# Altium PCB Main Board-v1.0.PcbDoc
Units mm, origin at the board's own origin, x right, y up, seen from the top; angles counter-clockwise.
Board outline 30 x 18 mm, 2 copper layers (Top Layer, Bottom Layer), stack 1.57 mm thick; 50 components, 32 nets, 177 pads, 55 vias.
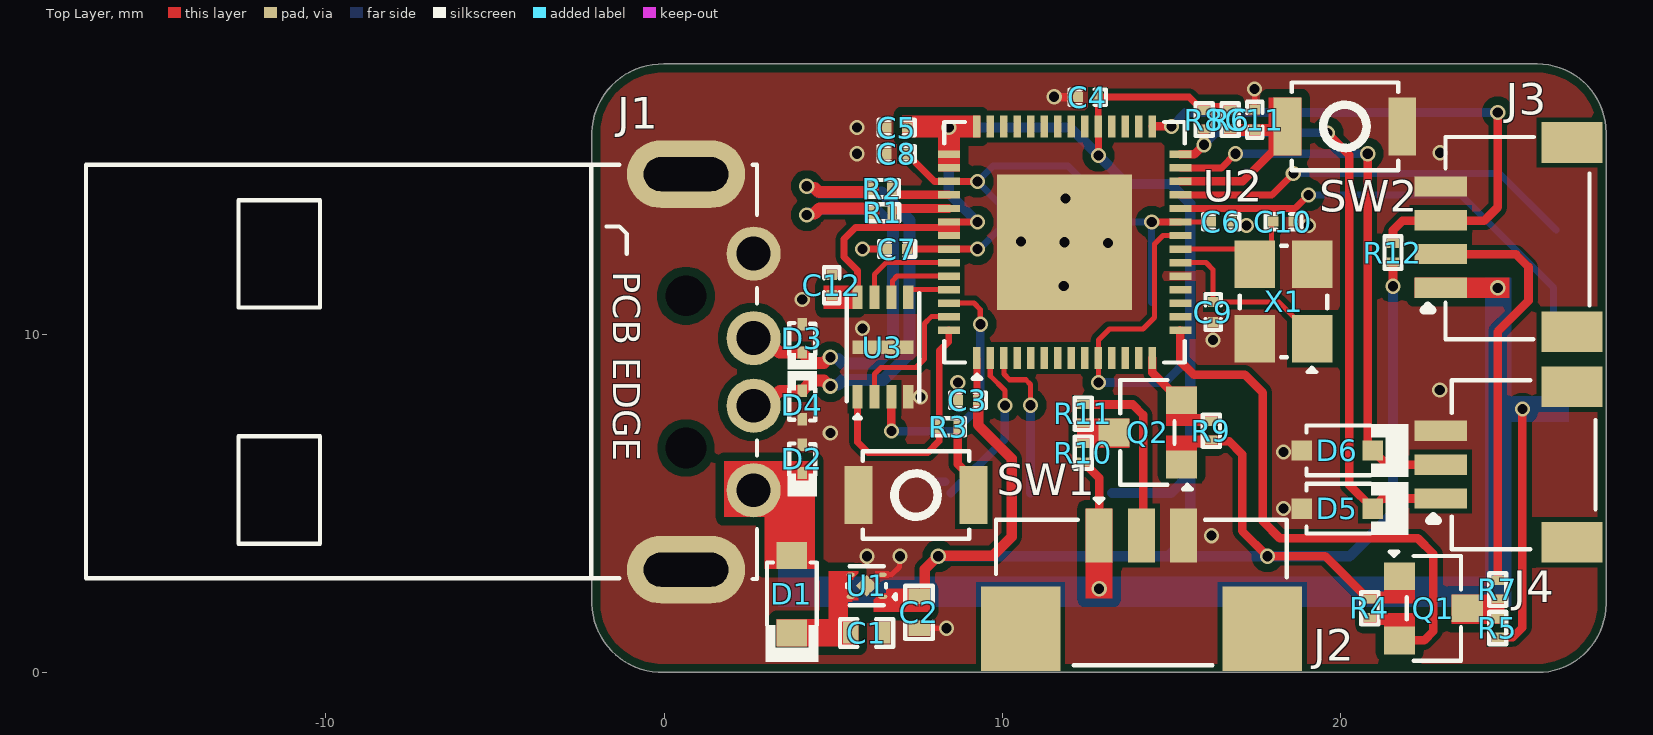
[diagram p0: Top Layer view]
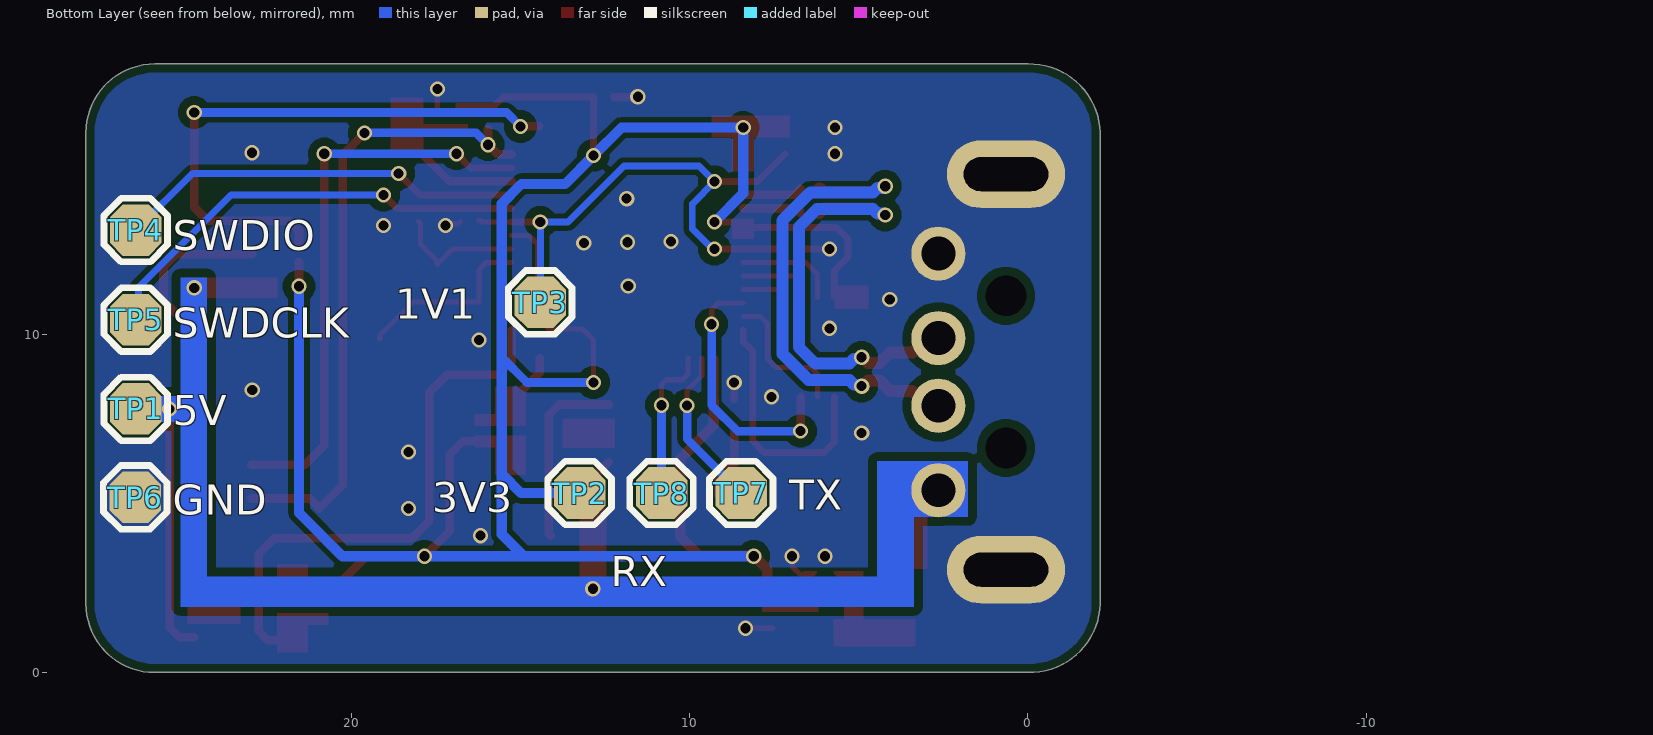
[diagram p1: Bottom Layer view, seen from below]

## Layer stack, top to bottom
Top Solder: solder mask 0.01, Solder Resist, Dk 3.5
Top Layer: signal copper 0.035
Dielectric 1: dielectric 1.5, FR-4, Dk 4.8
Bottom Layer: signal copper 0.035
Bottom Solder: solder mask 0.01, Solder Resist, Dk 3.5

## Board outline
-2.134,2.032 -2.134,15.968 cw(c-0.051,15.917) 0,18 25.834,18 cw(c25.834,15.968) 27.866,15.968 27.866,2.032 cw(c25.834,2.032) 25.834,0 0,0 cw(c-0.051,2.083)

## Design rules (kind name [scope] priority, off if disabled: settings)
BoardOutlineClearance [All] p1: gap=0 ignorepadtopadclearanceinfootprint=FALSE except(0.254: Poly-OutlineEdge)
Clearance "Differential clearance" [InDifferentialPairClass('USB A')] p1: gap=0.254 ignorepadtopadclearanceinfootprint=TRUE except(0: Arc-Hole Track-Hole SMDPad-Hole THPad-Hole Via-Hole Fill-Hole Poly-Hole Region-Hole Text-Hole; 0.127: Arc-Arc Arc-Track Arc-SMDPad Track-Track Track-SMDPad; 0.152: Arc-Fill Arc-Poly Arc-Region Track-Fill Track-Poly Track-Region SMDPad-SMDPad SMDPad-Fill SMDPad-Poly SMDPad-Region)
Clearance [All] p2: gap=0.254 ignorepadtopadclearanceinfootprint=TRUE except(0: Arc-Hole Track-Hole SMDPad-Hole THPad-Hole Via-Hole Fill-Hole Poly-Hole Region-Hole Text-Hole; 0.127: Arc-Arc Arc-Track Arc-SMDPad Track-Track Track-SMDPad; 0.152: Arc-Fill Arc-Poly Arc-Region Track-Fill Track-Poly Track-Region SMDPad-SMDPad SMDPad-Fill SMDPad-Poly SMDPad-Region; 0.178: Arc-Via Track-Via SMDPad-Via)
ComponentClearance [All] p1: gap=0 collisioncheckmode=3 verticalgap=0.254 showdistances=FALSE
DiffPairsRouting [InDifferentialPairClass('USB A')] p1: maxlimit=0.127 minlimit=0.127 mostfreqgap=0.127 toplayer_minwidth=0.356 toplayer_maxwidth=0.356 toplayer_prefwidth=0.356 bottomlayer_minwidth=0.356 bottomlayer_maxwidth=0.356 bottomlayer_prefwidth=0.356 impedanceprofiledriven=TRUE impedanceprofileid={A3CE3727-35C4-4ABA-9746-1EB76A5391A9} impedanceprofilevalue=90.000000 maxuncoupledlength=12.7
Height [All] p1: minheight=0 maxheight=35 prefheight=0
MinimumSolderMaskSliver [All] p1: minsoldermaskwidth=0
PolygonConnect [All] p1: connectstyle=Direct reliefconductorwidth=0.254 reliefentries=4 polygonreliefangle="90 Angle" airgapwidth=0.254
RoutingVias [All] p1: holewidth=0.3 width=0.45 viastyle="Through Hole" minholewidth=0.3 minwidth=0.45 maxholewidth=0.3 maxwidth=0.45
SilkToSilkClearance [All] p1: silktosilkclearance=0
SilkToSolderMaskClearance [IsPad] p1: minsilkscreentomaskgap=0 clearancetoexposedcopper=TRUE
SolderMaskExpansion [All] p1: expansion=0.102 istentingtop=FALSE
Width [All] p1: maxlimit=0.305 minlimit=0.152 preferedwidth=0.254
24 further rules are at their usual default settings.

## Classes and differential pairs
differential pair class "USB A": USB_D USB_D+
differential pair USB_D+: +USB_D+_P -USB_D+_N

## Components (designator, comment, footprint, x,y, rotation, side; value= is the part's Value field where it differs from the comment)
C1 "10uF" Cap-0402 5.994,1.168 r180 top
C2 "10uF" Cap-0402 7.544,1.778 r90 top
C3 "0.1uF" CAP-0201 8.992,8.052 r180 top
C4 "0.1uF" CAP-0201 12.54,17.018 r180 top
C5 "0.1uF" CAP-0201 6.883,16.119 r180 top
C6 "0.1uF" CAP-0201 16.485,13.335 r0 top
C7 "0.1uF" CAP-0201 6.896,12.525 r180 top
C8 "1uF" Cap-0201 6.883,15.342 r180 top
C9 "15pF" Cap-0201 16.244,10.662 r90 top
C10 "15pF" Cap-0201 18.324,13.335 r180 top
C11 "0.1uF" CAP-0201 17.476,16.353 r270 top
C12 "0.1uF" CAP-0201 4.962,11.457 r270 top
D1 "NSR0320MW2T1G" SOD-323 3.785,2.311 r90 top value=25pF
D2 "DF2S6.8FS,L3M" SOD-923. 4.089,6.318 r90 top
D3 "DF2S6.8FS,L3M" SOD-923. 4.089,9.881 r90 top locked
D4 "DF2S6.8FS,L3M" SOD-923. 4.089,7.911 r270 top locked
D5 "MM3Z3V3B" SOD323F 19.919,4.847 r0 top
D6 "MM3Z3V3B" SOD323F 19.919,6.568 r0 top
J1 "USB-05." USB-05. 1.651,8.89 r270 top locked
J2 "HC-1.25-3PLT" HC-1.25-3PLT 14.122,2.667 r0 top
J3 "SM04B-SRSS-TB(LF)(SN)" SM04B-SRSS-TB(LF)(SN) 24.917,12.878 r90 top locked
J4 "SM03B-SRSS-TB(LF)(SN)" SM03B-SRSS-TB(LF)(SN) 24.917,6.147 r90 top locked
Q1 "Si2302CDS" Sot-23 22.761,1.898 r270 top
Q2 "Si2302CDS" Sot-23 14.313,7.099 r90 top
R1 "27R" Res-0201 6.475,13.598 r180 top
R2 "27R" Res-0201 6.462,14.316 r180 top
R3 "1K" Res-0201 8.417,7.264 r180 top value=1kR
R4 "10K" Res-0201 20.882,1.898 r90 top
R5 "10K" Res-0201 24.663,1.315 r270 top
R6 "10K" Res-0201 16.746,16.353 r90 top
R7 "75R" Res-0201 24.663,2.448 r90 top
R8 "10K" Res-0201 15.977,16.353 r270 top
R9 "10K" Res-0201 16.192,7.15 r270 top
R10 "10K" Res-0201 12.403,6.499 r270 top
R11 "75R" Res-0201 12.403,7.652 r90 top
R12 "10K" Res-0201 21.565,12.421 r90 top
SW1 "B3U-1000P" B3U-1000P 7.456,5.248 r180 top locked
SW2 "B3U-1000P" B3U-1000P 20.142,16.154 r0 top locked
TP1 "TEST POINT" Test-point 26.394,7.796 r0 bottom
TP2 "TEST POINT" Test-point 13.259,5.309 r0 bottom
TP3 "TEST POINT" Test-point 14.426,10.947 r0 bottom
TP4 "TEST POINT" Test-point 26.394,13.086 r0 bottom
TP5 "TEST POINT" Test-point 26.394,10.437 r0 bottom
TP6 "TEST POINT" Test-point 26.407,5.18 r0 bottom
TP7 "TEST POINT" Test-point 8.484,5.309 r0 bottom
TP8 "TEST POINT" Test-point 10.84,5.309 r0 bottom
U1 "RS3236-3.3YUTDN4" XDFN-4-EP(1x1) 5.994,2.565 r180 top
U2 "RP2040" "56-QFN (7X7)" 11.849,12.725 r90 top locked
U3 "GD25Q16EEIGR" USON-8(2x3) 6.477,9.627 r90 top
X1 "12MHz" SMD3225-4P 18.326,10.973 r90 top

## Footprints (in the part's own frame and the unit in brackets; to place one, negate y for a bottom-side part, rotate by r counter-clockwise, add the part's x,y. Pads: shape width x height; smd on the part's side, far side on the other; paste and mask are expansions set on the pad)
"56-QFN (7X7)" [mm]
  rect 0.65x0.22 smd mask+0.055: 1(-3.425,2.6) 2(-3.425,2.2) 3(-3.425,1.8) 4(-3.425,1.4) 5(-3.425,1) 6(-3.425,0.6) 7(-3.425,0.2) 8(-3.425,-0.2) 9(-3.425,-0.6) 10(-3.425,-1) 11(-3.425,-1.4) 12(-3.425,-1.8) 13(-3.425,-2.2) 14(-3.425,-2.6) 29(3.425,-2.6) 30(3.425,-2.2) 31(3.425,-1.8) 32(3.425,-1.4) 33(3.425,-1) 34(3.425,-0.6) 35(3.425,-0.2) 36(3.425,0.2) 37(3.425,0.6) 38(3.425,1) 39(3.425,1.4) 40(3.425,1.8) 41(3.425,2.2) 42(3.425,2.6)
  rect 0.22x0.65 smd mask+0.055: 15(-2.6,-3.425) 16(-2.2,-3.425) 17(-1.8,-3.425) 18(-1.4,-3.425) 19(-1,-3.425) 20(-0.6,-3.425) 21(-0.2,-3.425) 22(0.2,-3.425) 23(0.6,-3.425) 24(1,-3.425) 25(1.4,-3.425) 26(1.8,-3.425) 27(2.2,-3.425) 28(2.6,-3.425) 43(2.6,3.425) 44(2.2,3.425) 45(1.8,3.425) 46(1.4,3.425) 47(1,3.425) 48(0.6,3.425) 49(0.2,3.425) 50(-0.2,3.425) 51(-0.6,3.425) 52(-1,3.425) 53(-1.4,3.425) 54(-1.8,3.425) 55(-2.2,3.425) 56(-2.6,3.425)
  rect 4x4 smd mask+0.055: 57(0,0)
  silkscreen extent -4.04,-3.56 3.56,3.56, body extent -3.5,-3.51 3.5,3.49, height 0.92
B3U-1000P [mm] "SWITCH TACTILE SPST-NO 0.05A 12V"
  rect 0.82x1.72 smd: 1(-1.7,0) 2(1.7,0)
  silkscreen extent -1.57,-1.3 1.57,1.3, body extent -2,-1.26 2,1.24, height 1.6
CAP-0201 [mm]
  rect 0.3x0.3 smd mask+0.055: 1(-0.3,0) 2(0.3,0)
  silkscreen extent -0.53,-0.23 0.53,0.23, body extent -0.3,-0.15 0.3,0.15, height 0.28
Cap-0201 [mm]
  rect 0.3x0.3 smd mask+0.055: 1(-0.3,0) 2(0.3,0)
  silkscreen extent -0.53,-0.23 0.53,0.23, body extent -0.3,-0.15 0.3,0.15, height 0.28
Cap-0402 [mil]
  rect 18x25 smd mask+2.36: 1(-18.5,0) 2(18.5,0)
  silkscreen extent -31,-16 31,16, body extent -20,-10 20,10, height 19
HC-1.25-3PLT [mm]
  rect 0.8x1.6 smd paste+0 mask+0.05: 1(-1.25,1.38) 2(0,1.38) 3(1.25,1.38)
  rect 2.35x2.5 smd paste+0 mask+0.05: MP1(-3.575,-1.38) MP2(3.575,-1.38)
  silkscreen extent -4.3,-2.45 4.3,2.48, body extent -4.3,-2.18 4.3,1.74, height 4.71
Res-0201 [mm]
  rect 0.27x0.37 smd mask+0.055: 1(-0.275,0) 2(0.275,0)
  silkscreen extent -0.48,-0.25 0.48,0.25, body extent -0.3,-0.15 0.3,0.15, height 0.29
SM03B-SRSS-TB(LF)(SN) [mm]
  rect 0.6x1.55 smd paste+0 mask+0.051: 1(-1,1.938) 2(0,1.938) 3(1,1.938)
  rect 1.2x1.8 smd paste+0 mask+0.051: MP1(-2.3,-1.938) MP2(2.3,-1.938)
  silkscreen extent -2.5,-2.64 2.5,2.29, body extent -2.5,-2.58 2.5,2.37, height 2.91
SM04B-SRSS-TB(LF)(SN) [mm]
  rect 0.6x1.55 smd paste+0 mask+0.051: 1(-1.5,1.938) 2(-0.5,1.938) 3(0.5,1.938) 4(1.5,1.938)
  rect 1.2x1.8 smd paste+0 mask+0.051: MP1(-2.8,-1.938) MP2(2.8,-1.938)
  silkscreen extent -3.02,-2.46 2.96,2.45, body extent -3,-2.52 3,2.43, height 2.96
SMD3225-4P [mm]
  rect 1.4x1.2 smd: 1(-1.1,-0.85) 2(1.1,-0.85) 3(1.1,0.85) 4(-1.1,0.85)
  silkscreen extent -2.08,-1.3 1.65,1.3, body extent -1.6,-1.25 1.6,1.25, height 0.81
SOD323F [mm]
  rect 0.6x0.6 smd: 1(-1.05,0) 2(1.05,0)
  silkscreen extent -0.91,-0.79 2.11,0.79, body extent -1.25,-0.68 1.25,0.68, height 1
SOD-323 [mm]
  rect 0.8x0.9 smd mask+0.055: 1(-1.15,0) 2(1.15,0)
  silkscreen extent -2.01,-0.79 0.94,0.79, body extent -1.3,-0.67 1.3,0.67, height 1.1
SOD-923. [mm]
  rect 0.36x0.27 smd: 1(-0.42,0) 2(0.42,0)
  silkscreen extent -1.12,-0.43 0.46,0.43, body extent -0.52,-0.32 0.53,0.33, height 0.43
Sot-23 [mm] "TRANS NPN 40V 0.6A SOT23"
  rect 0.82x0.92 smd: 1(-0.95,-1) 2(0.95,-1) 3(0,1)
  silkscreen extent -1.68,-1.3 1.55,0.81, body extent -1.5,-1.25 1.5,1.25, height 1.05
Test-point [mil]
  oct 60x60 smd: 1(0,0)
  silkscreen extent -37,-37 37,37
USB-05. [mm]
  round 1.6 hole 1 paste+0 mask+0.051: 1(3.5,1) 2(1,1) 3(-1,1) 4(-3.5,1)
  oval 2x3.5 hole 1 slot 2.5 at 90 deg paste+0 mask+0.051: SH1(-5.85,-1) SH2(5.85,-1)
  round 0 hole 1.2 unplated paste+0: ""(-2.25,-1) ""(2.25,-1)
  silkscreen extent -6.13,-18.75 6.13,1.1, body extent -6.1,-18.71 6.1,1.14, height 2.65
USON-8(2x3) [mm]
  rect 0.7x0.3 smd mask+0.055: 1(-1.473,0.75) 2(-1.473,0.25) 3(-1.473,-0.25) 4(-1.473,-0.75) 5(1.473,-0.75) 6(1.473,-0.25) 7(1.473,0.25) 8(1.473,0.75)
  rect 0.4x1.8 smd: 9(0,0)
  silkscreen extent -2.11,-1.07 1.6,1.07, body extent -1.5,-1 1.5,1, height 0.47
XDFN-4-EP(1x1) [mm]
  oval 0.27x0.12 smd: 1(-0.475,0.325)
  oval 0.24x0.12 smd: 2(-0.475,-0.325) 3(0.475,-0.325) 4(0.475,0.325)
  rect 0.45x0.45 smd rot 135 paste+0 mask+0.051: 5(0,0)
  Top Layer region: -0.65,-0.425 -0.65,-0.225 -0.4,-0.225 -0.25,-0.375 -0.25,-0.425 -0.65,-0.425
  Top Layer region: 0.65,0.425 0.65,0.225 0.4,0.225 0.25,0.375 0.25,0.425 0.65,0.425
  Top Layer region: 0.65,-0.425 0.25,-0.425 0.25,-0.375 0.4,-0.225 0.65,-0.225 0.65,-0.425
  Top Layer region: -0.4,0.225 -0.65,0.225 -0.65,0.425 -0.2,0.425 -0.25,0.375 -0.4,0.225
  silkscreen extent -0.86,-0.58 0.57,0.58, body extent -0.51,-0.5 0.51,0.5, height 0.62

## Part data
C1 C2: library part CL05A106MP5NUNC, "CAP CER 10UF 10V X5R 0402", Case Code (Imperial)=0402, Case Code (Metric)=1005, Dielectric=X5R, LCSC Part Number=C315248, Manufacturer=Samsung, Max Operating Temperature=85°C, Min Operating Temperature=-55°C, Package Quantity=1, Tolerance=20%, Voltage Rating=10V, Capacitance=10uF, Case/Package=0402, Category="Ceramic Capacitors", ComponentLink1Description=https://datasheet.ciiva.com/25721/cl05a106mp5nunc-25721584.pdf?src-supplier=Digi-Key, ComponentLink1URL=https://datasheet.ciiva.com/25721/cl05a106mp5nunc-25721584.pdf?src-supplier=Digi-Key, ComponentLink2Description=https://datasheet.ciiva.com/26838/getdatasheetpartid-745310-26838170.pdf?src-supplier=Verical, ComponentLink2URL=https://datasheet.ciiva.com/26838/getdatasheetpartid-745310-26838170.pdf?src-supplier=Verical, Construction=Flat, Contact Plating=Tin, Depth=0.5mm, Item Type=Capacitor, Lead Free="Lead Free", Length=1mm, Manufacturer Part Number=CL05A106MP5NUNC, Mount="Surface Mount", Packaging="Tape and Reel", Pricing 1="10000=0.02537 (USD)", Radiation Hardening=No, RoHS=Yes, RoHS Compliant=Yes, Series=CL, Stock 1=1729850, Supplier 1=Avnet, Supplier Part Number 1=CL05A106MP5NUNC, Termination=Wraparound, Thickness=0.028inch, Width=0.02inch
C3 C4 C5 C6 C7 C11 C12: library part GRM033R61E104ME14D, "CAP CER 0.1UF 25V X5R 0201", LCSC Part Number=C2649557, Manufacturer=Murata, Voltage Rating (DC)=25V, ComponentLink1Description=https://datasheet.octopart.com/GRM033R61E104ME14D-Murata-datasheet-96224008.pdf?src-supplier=Future+Electronics, ComponentLink1URL=https://datasheet.octopart.com/GRM033R61E104ME14D-Murata-datasheet-96224008.pdf?src-supplier=Future+Electronics, ComponentLink2Description=http://search.murata.co.jp/Ceramy/image/img/A01X/G101/ENG/GRM033R61E104ME14-01.pdf?src-supplier=Digikey, ComponentLink2URL=http://search.murata.co.jp/Ceramy/image/img/A01X/G101/ENG/GRM033R61E104ME14-01.pdf?src-supplier=Digikey, ComponentLink3Description=http://psearch.en.murata.com/capacitor/product/GRM033R61E104ME14%23.pdf?src-supplier=Avnet, ComponentLink3URL=http://psearch.en.murata.com/capacitor/product/GRM033R61E104ME14%23.pdf?src-supplier=Avnet, Height=330um, Item Type=Capacitors, Manufacturer Part Number=GRM033R61E104ME14D, Material=4241ConductorMaterial, Pricing="15000=0.0037, 45000=0.0036, 75000=0.0035, 300000=0.0034, 450000=0.0033 (USD)", RoHS=Yes, Stock=270000, Supplier="Future Electronics"
C8: library part CC0201KRX5R5BB105, "CAP CER 1UF 6.3V X5R 0201", Case Code (Imperial)=0201, Case Code (Metric)=0603, LCSC Part Number=C541330, Manufacturer=Yageo, Max Operating Temperature=85°C, Min Operating Temperature=-55°C, Tolerance=10%, Voltage Rating=6.3V, Capacitance=1uF, Case/Package=0201, Category="Ceramic Capacitors", ComponentLink1Description=http://www.yageo.com/documents/recent/UPY-GPHC_X5R_4V-to-50V_25.pdf?src-supplier=Digi-Key, ComponentLink1URL=http://www.yageo.com/documents/recent/UPY-GPHC_X5R_4V-to-50V_25.pdf?src-supplier=Digi-Key, ComponentLink2Description=https://www.yageo.com/upload/media/product/productsearch/datasheet/mlcc/UPY-GPHC_X5R_4V-to-50V_26.pdf?src-supplier=Digi-Key, ComponentLink2URL=https://www.yageo.com/upload/media/product/productsearch/datasheet/mlcc/UPY-GPHC_X5R_4V-to-50V_26.pdf?src-supplier=Digi-Key, Item Type=Capacitor, Manufacturer Part Number=CC0201KRX5R5BB105, Mount="Surface Mount", Packaging="Cut Tape", Pricing 1="15000=0.00740 (USD)", RoHS=Yes, RoHS Compliant=Yes, Stock 1=600000, Supplier 1="Arrow Electronics", Supplier Part Number 1=CC0201KRX5R5BB105
C9 C10: library part CC0201JRNPO9BN150, "CAP CER 15PF 50V C0G/NPO 0201", LCSC Part Number=C277480, Manufacturer=Yageo, Supplier Part Number=2580314, Category="Ceramic Capacitors", ComponentLink1Description=https://datasheet.ciiva.com/176/mlccorderingcode-176501.pdf?src-supplier=Digi-Key, ComponentLink1URL=https://datasheet.ciiva.com/176/mlccorderingcode-176501.pdf?src-supplier=Digi-Key, ComponentLink2Description=https://datasheet.ciiva.com/176/mlccorderingcode-176502.pdf?src-supplier=Digi-Key, ComponentLink2URL=https://datasheet.ciiva.com/176/mlccorderingcode-176502.pdf?src-supplier=Digi-Key, ComponentLink3Description=https://datasheet.ciiva.com/176/mlccorderingcode-176503.pdf?src-supplier=Digi-Key, ComponentLink3URL=https://datasheet.ciiva.com/176/mlccorderingcode-176503.pdf?src-supplier=Digi-Key, ComponentLink4Description=https://datasheet.ciiva.com/17205/upy-gp-np0-16v-to-50v-8-17205625.pdf?src-supplier=Future+Electronics, ComponentLink4URL=https://datasheet.ciiva.com/17205/upy-gp-np0-16v-to-50v-8-17205625.pdf?src-supplier=Future+Electronics, Item Type=Capacitor, Manufacturer Part Number=CC0201JRNPO9BN150, Pricing="15000=0.0012, 60000=0.0011, 225000=0.0011, 600000=0.001, 1500000=0.001 (USD)", RoHS=Yes, Stock=585000, Supplier="Future Electronics"
D1: "DIODE SCHOTTKY 20V 1A SOD323", Average Rectified Current=1A, Case/Package=SOD-323-2, Forward Voltage=500mV, LCSC Part Number=C48192, Manufacturer="ON Semiconductor", Max Forward Surge Current (Ifsm)=5A, Max Operating Temperature=125°C, Max Repetitive Reverse Voltage (Vrrm)=23V, Max Reverse Current=50uA, Max Reverse Voltage (DC)=20V, Min Operating Temperature=-55°C, Package Quantity=1, Power Dissipation=200mW, ComponentLink1Description=https://datasheet.ciiva.com/915/nsr0320mw2t1-d-915506.pdf?src-supplier=Avnet, ComponentLink1URL=https://datasheet.ciiva.com/915/nsr0320mw2t1-d-915506.pdf?src-supplier=Avnet, ComponentLink2Description=https://datasheet.ciiva.com/4714/nsr0320mw2t1-d-97861-4714197.pdf?src-supplier=Mouser, ComponentLink2URL=https://datasheet.ciiva.com/4714/nsr0320mw2t1-d-97861-4714197.pdf?src-supplier=Mouser, ComponentLink3Description=https://datasheet.ciiva.com/915/nsr0320mw2t1-d-915508.pdf?src-supplier=Digikey, ComponentLink3URL=https://datasheet.ciiva.com/915/nsr0320mw2t1-d-915508.pdf?src-supplier=Digikey, ComponentLink4Description=https://datasheet.ciiva.com/16210/nsr0320mw2t1-d-16210139.pdf?src-supplier=Future+Electronics, ComponentLink4URL=https://datasheet.ciiva.com/16210/nsr0320mw2t1-d-16210139.pdf?src-supplier=Future+Electronics, Element Configuration=Single, Forward Current=1A, Height=0.9mm, Item Type=Diode, Lead Free="Lead Free", Length=1.8mm, Manufacturer Part Number=NSR0320MW2T1G, Max Reverse Leakage Current=50uA, Packaging="Tape and Reel", Pins=2, Pricing="3000=0.0283, 9000=0.0276, 15000=0.0273, 30000=0.0253, 60000=0.0265, 90000=0.0259 (USD)", Radiation Hardening=No, Reach SVHC Compliant=No, Reverse Voltage=20V, RoHS=Yes, RoHS Compliant=Yes, Series=-, Stock=165000, Supplier="Future Electronics", Width=1.35mm
D2 D3 D4: "TVS DIODE 5VWM 9VC SOD923", LCSC Part Number=C1972978, Manufacturer=Toshiba, Min Breakdown Voltage=6.4V, Peak Pulse Current=1A, Power Line Protection=No, Reverse Standoff Voltage=5V, ComponentLink1Description=http://www.mouser.com/ds/2/408/DF2S6.8FS_datasheet_en_20140709-708755.pdf?src-supplier=Mouser, ComponentLink1URL=http://www.mouser.com/ds/2/408/DF2S6.8FS_datasheet_en_20140709-708755.pdf?src-supplier=Mouser, ComponentLink2Description=https://toshiba.semicon-storage.com/info/docget.jsp?did=22219&prodName=DF2S6.8FS&src-supplier=Digikey, ComponentLink2URL=https://toshiba.semicon-storage.com/info/docget.jsp?did=22219&prodName=DF2S6.8FS&src-supplier=Digikey, Diode Type=ZENER, Item Type="TVS Diodes", Manufacturer Part Number=DF2S6.8FS,L3M, Mounting Technology="Surface Mount", Number of Unidirectional Channels=1, Packaging="Cut Tape", Pricing="1=0.1, 10=0.068, 100=0.031, 500=0.0275, 1000=0.024, 2000=0.022, 5000=0.02 (USD)", RoHS=No, RoHS Compliant=No, Series=-, Stock=487248, Supplier=Digikey
D5 D6: "DIODE ZENER 3.3V 200MW SOD323F", Forward Voltage=1V, LCSC Part Number=C2978865, Manufacturer="ON Semiconductor / Fairchild", Max Operating Temperature=150°C, Max Power Dissipation=200mW, Max Reverse Leakage Current=4.5uA, Min Operating Temperature=-65°C, Package Quantity=1, Supplier Part Number 1=MM3Z3V3BCT-ND, Test Current=5mA, Tolerance=2%, Working Voltage=3.3V, ComponentLink1Description=http://www.onsemi.com/pub/Collateral/MM3Z9V1B-D.pdf?src-supplier=Digi-Key, ComponentLink1URL=http://www.onsemi.com/pub/Collateral/MM3Z9V1B-D.pdf?src-supplier=Digi-Key, ComponentLink2Description=http://www.mouser.com/ds/2/149/MM3Z3V3B-187166.pdf?src-supplier=Mouser, ComponentLink2URL=http://www.mouser.com/ds/2/149/MM3Z3V3B-187166.pdf?src-supplier=Mouser, ComponentLink3Description=https://www.fairchildsemi.com/datasheets/MM/MM3Z9V1B.pdf?src-supplier=Avnet, ComponentLink3URL=https://www.fairchildsemi.com/datasheets/MM/MM3Z9V1B.pdf?src-supplier=Avnet, ComponentLink4Description=http://www.farnell.com/datasheets/1706525.pdf?src-supplier=Element14, ComponentLink4URL=http://www.farnell.com/datasheets/1706525.pdf?src-supplier=Element14, Element Configuration=Single, Height=1mm, Impedance=89R, Item Type=Diode, Lead Free="Lead Free", Length=1.3mm, Manufacturer Part Number=MM3Z3V3B, Mount="Surface Mount", Number of Pins=2, Packaging="Tape and Reel", Peak Reverse Current=4.5uA, Power Dissipation=200mW, Pricing 1="1=0.22, 10=0.18, 100=0.0956, 500=0.06288, 1000=0.04276 (USD)", Radiation Hardening=No, REACH SVHC="No SVHC", Stock 1=473644, Supplier 1=Digi-Key, Voltage Tolerance=2%, Weight=0.0276g, Width=1.7mm, Zener Voltage=3.3V
J1: "USB 2.0 1 4P Public Type-A Plugin USB Connectors ROHS", LCSC Part Number=C112454, Manufacturer=SOFNG, Manufacturer Part Number=USB-05, Package=Plugin, ComponentLink1Description=LCSC, ComponentLink1URL=https://www.lcsc.com/product-detail/USB-Connectors_SOFNG-USB-05_C112454.html, Item Type="USB 2.0 1 4P Public Type-A Plugin USB Connectors ROHS"
J2: "1x3P 3P PicoBlade(MX 1.25) Tin 3 -25℃~+85℃ 2A 1 1.25mm Brass Standing paste SMD,P=1.25mm Wire To Board Connector ROHS", LCSC Part Number=C2845389, Manufacturer=HCTL, Package=SMD,P=1.25mm, ComponentLink1Description=LCSC, ComponentLink1URL=https://www.lcsc.com/product-detail/Wire-To-Board-Connector_HCTL-HC-1-25-3PLT_C2845389.html, Item Type=Connector, Manufacturer Part Number=HC-1.25-3PLT
J3: "CONN HEADER SMD R/A 4POS 1MM", Contact Resistance=40mR, Flammability Rating="UL94 V-0", Housing Color=Beige, Insulation Color=Natural, LCSC Part Number=C160404, Manufacturer=JST, Max Current Rating=1A, Max Operating Temperature=85°C, Max Voltage Rating (AC)=50V, Min Operating Temperature=-25°C, ComponentLink1Description=https://datasheet.ciiva.com/26894/getdatasheetpartid-640736-26894676.pdf?src-supplier=Verical, ComponentLink1URL=https://datasheet.ciiva.com/26894/getdatasheetpartid-640736-26894676.pdf?src-supplier=Verical, ComponentLink2Description=https://datasheet.ciiva.com/26894/getdatasheetpartid-499363-26894945.pdf?src-supplier=Verical, ComponentLink2URL=https://datasheet.ciiva.com/26894/getdatasheetpartid-499363-26894945.pdf?src-supplier=Verical, ComponentLink3Description=https://datasheet.ciiva.com/16487/jstsm04b-srss-tb-lf-sn-16487222.pdf?src-supplier=Future+Electronics, ComponentLink3URL=https://datasheet.ciiva.com/16487/jstsm04b-srss-tb-lf-sn-16487222.pdf?src-supplier=Future+Electronics, Connector Type=Header, Contact Finish - Mating=TIN, Contact Material="Copper Alloy", Contact Plating=Copper,Tin, Contact Shape=Square, Contact Type="Male Pin", Depth=4.95mm, Fastening Type=Pull, Housing Material=Polyamide, Insulation Material=Nylon, Item Type="Headers and Wire Housings", Length=6mm, Manufacturer Part Number=SM04B-SRSS-TB(LF)(SN), Max Voltage Rating (DC)=50V, Mounting Technology="Surface Mount", Number of Contacts=4NUMBER, Number of Positions=4, Number of Rows=1, Orientation="Right Angle", Packaging="Tape and Reel", Pitch=1mm, Pricing="3000=0.285, 6000=0.275 (USD)", RoHS=Yes, Series=SR, Stock=27000, Supplier="Future Electronics", Termination=Solder, Voltage Rating=50V
J4: "CONN HEADER SMD R/A 3POS 1MM", LCSC Part Number=C160403, Manufacturer=JST, ComponentLink1Description=https://datasheet.ciiva.com/26894/getdatasheetpartid-708885-26894671.pdf?src-supplier=Verical, ComponentLink1URL=https://datasheet.ciiva.com/26894/getdatasheetpartid-708885-26894671.pdf?src-supplier=Verical, ComponentLink2Description=https://datasheet.ciiva.com/8052/91630-8052263.pdf?src-supplier=Element14, ComponentLink2URL=https://datasheet.ciiva.com/8052/91630-8052263.pdf?src-supplier=Element14, ComponentLink3Description=https://datasheet.ciiva.com/16394/sm03b-srss-tblfsn-16394332.pdf?src-supplier=Future+Electronics, ComponentLink3URL=https://datasheet.ciiva.com/16394/sm03b-srss-tblfsn-16394332.pdf?src-supplier=Future+Electronics, Gender=29Gender, Item Type=Connectors, Lead Free=5697LeadFree, Manufacturer Part Number=SM03B-SRSS-TB(LF)(SN), Pricing="3000=0.22, 6000=0.215 (USD)", RoHS=Yes, Stock=6000, Supplier="Future Electronics"
Q1 Q2: "N-CHANNEL 20-V (D-S) MOSFET", LCSC Part Number=C5310968, Manufacturer="TECH PUBLIC", Manufacturer Part Number=SI2302CDS, Package=SOT-23, ComponentLink1Description=LCSC, ComponentLink1URL=https://www.lcsc.com/product-detail/MOSFETs_TECH-PUBLIC-SI2302CDS_C5310968.html, Item Type=Mosfet
R1 R2: library part RC0201FR-0727RL, "RES 27 OHM 1% 1/20W 0201", LCSC Part Number=C273268, Manufacturer=Yageo, ComponentLink1Description=http://www.mouser.com/ds/2/447/RC0201-559633.pdf?src-supplier=Mouser, ComponentLink1URL=http://www.mouser.com/ds/2/447/RC0201-559633.pdf?src-supplier=Mouser, ComponentLink2Description=https://datasheet.octopart.com/RC0201FR-0727RL-Yageo-datasheet-164759695.pdf?src-supplier=Future+Electronics, ComponentLink2URL=https://datasheet.octopart.com/RC0201FR-0727RL-Yageo-datasheet-164759695.pdf?src-supplier=Future+Electronics, ComponentLink3Description=https://www.yageo.com/upload/media/product/productsearch/datasheet/rchip/PYu-RC_Group_51_RoHS_L_11.pdf?src-supplier=Digikey, ComponentLink3URL=https://www.yageo.com/upload/media/product/productsearch/datasheet/rchip/PYu-RC_Group_51_RoHS_L_11.pdf?src-supplier=Digikey, ComponentLink4Description=http://www.yageo.com/documents/recent/PYu-RC_Group_51_RoHS_L_9.pdf?src-supplier=Digikey, ComponentLink4URL=http://www.yageo.com/documents/recent/PYu-RC_Group_51_RoHS_L_9.pdf?src-supplier=Digikey, Item Type=Resistors, Manufacturer Part Number=RC0201FR-0727RL, Pricing="10000=0.0007, 50000=0.0006, 250000=0.0006, 1000000=0.0006, 2500000=0.0006 (USD)", RoHS=Yes, Stock=20000, Supplier="Future Electronics"
R3: library part RC0201FR-071KL, "RES 1K OHM 1% 1/20W 0201", Case Code (Imperial)=0201, Case Code (Metric)=0603, LCSC Part Number=C138165, Manufacturer=Yageo, Max Operating Temperature=125°C, Max Power Dissipation=50mW, Min Operating Temperature=-55°C, Package Quantity=10000, Resistance Tolerance=1%, Resistor Type="Thick Film", Supplier Part Number=311-1KMCT-ND, Temperature Coefficient=200ppm/°C, Voltage Rating=25V, Case/Package=0201, Category="Chip SMD Resistors", ComponentLink1Description=https://datasheet.ciiva.com/7672/1563626-7672204.pdf?src-supplier=Element14, ComponentLink1URL=https://datasheet.ciiva.com/7672/1563626-7672204.pdf?src-supplier=Element14, ComponentLink2Description=https://datasheet.ciiva.com/22698/1563626-22698505.pdf?src-supplier=Element14, ComponentLink2URL=https://datasheet.ciiva.com/22698/1563626-22698505.pdf?src-supplier=Element14, ComponentLink3Description=https://datasheet.ciiva.com/29721/pyu-r-int-thick-7-29721196.pdf?src-supplier=Digi-Key, ComponentLink3URL=https://datasheet.ciiva.com/29721/pyu-r-int-thick-7-29721196.pdf?src-supplier=Digi-Key, ComponentLink4Description=https://datasheet.ciiva.com/29721/pyu-r-int-thick-7-29721195.pdf?src-supplier=Digi-Key, ComponentLink4URL=https://datasheet.ciiva.com/29721/pyu-r-int-thick-7-29721195.pdf?src-supplier=Digi-Key, ComponentLink5Description=https://datasheet.ciiva.com/8896/pyu-rc0201-51-rohs-l-8-8896174.pdf?src-supplier=Avnet, ComponentLink5URL=https://datasheet.ciiva.com/8896/pyu-rc0201-51-rohs-l-8-8896174.pdf?src-supplier=Avnet, Construction=Rectangular, Contact Plating=Tin,Matte, Depth=0.3mm, Features="Moisture Resistant", Height=0.01inch, Item Type=Resistor, Lead Free=5697LeadFree, Length=0.024inch, Manufacturer Part Number=RC0201FR-071KL, Military Standard=Not, Number of Terminations=2, Packaging="Tape and Reel", Power Rating=50mW, Pricing="1=0.1, 10=0.027, 50=0.0172, 100=0.0143, 500=0.00988, 1000=0.00854, 5000=0.00629 (USD)", Reach SVHC Compliant=Unknown, RoHS=Yes, RoHS Compliant=Yes, Series=RC, Stock=5606340, Supplier=Digi-Key, Technology="THICK FILM", Termination=SMD/SMT, Tolerance=1%, Voltage Rating (DC)=25V, Width=0.012inch, Working Voltage=25V
R4 R5 R6 R8 R9 R10 R12: library part RC0201FR-0710KL, "RES SMD 10K OHM 1% 1/20W 0201", LCSC Part Number=C106225, Manufacturer=Yageo, Package=0201, ComponentLink7Description=LCSC, ComponentLink7URL=https://www.lcsc.com/product-detail/Chip-Resistor-Surface-Mount_YAGEO-RC0201FR-0710KL_C106225.html, Item Type=Resistor, Manufacturer Part Number=RC0201FR-0710KL
R7 R11: library part RC0201FR-0775RL, "RES 75 OHM 1% 1/20W 0201", LCSC Part Number=C274878, Manufacturer=Yageo, ComponentLink1Description=https://datasheet.ciiva.com/14985/pyu-r-int-thick-7-14985434.pdf?src-supplier=Digikey, ComponentLink1URL=https://datasheet.ciiva.com/14985/pyu-r-int-thick-7-14985434.pdf?src-supplier=Digikey, Item Type="Chip SMD Resistors", Manufacturer Part Number=RC0201FR-0775RL, Pricing="1=0.1, 10=0.028, 50=0.0176, 100=0.0146, 500=0.00992, 1000=0.00853, 5000=0.00626 (USD)", RoHS=Yes, Stock=3381, Supplier=Digikey
SW1 SW2: "SWITCH TACTILE SPST-NO 0.05A 12V", Contact Current Rating=50mA, Contact Resistance=100mR, Insulation Resistance=100MR, LCSC Part Number=C231329, Manufacturer=Omron, Max Operating Temperature=70°C, Max Voltage Rating (DC)=12V, Min Operating Temperature=-25°C, Operating Force=1.5N, Package Quantity=1, Ratings="Dust Proof,IP40", Supplier Part Number 1=SW1020DKR-ND, Actuator Length=0.4mm, Actuator Type=Standard, ComponentLink1Description=http://www.farnell.com/datasheets/60838.pdf?src-supplier=Farnell, ComponentLink1URL=http://www.farnell.com/datasheets/60838.pdf?src-supplier=Farnell, ComponentLink2Description=http://www.farnell.com/datasheets/60838.pdf?src-supplier=Element14, ComponentLink2URL=http://www.farnell.com/datasheets/60838.pdf?src-supplier=Element14, ComponentLink3Description=https://omronfs.omron.com/en_US/ecb/products/pdf/en-b3u.pdf?src-supplier=Digi-Key, ComponentLink3URL=https://omronfs.omron.com/en_US/ecb/products/pdf/en-b3u.pdf?src-supplier=Digi-Key, ComponentLink4Description=http://www.omron.com/ecb/products/pdf/en-b3u.pdf?src-supplier=Digi-Key, ComponentLink4URL=http://www.omron.com/ecb/products/pdf/en-b3u.pdf?src-supplier=Digi-Key, ComponentLink5Description=https://www.distrelec.biz/Web/Downloads/he/et/B3U_eng_datasheet.pdf?mime=application%2Fpdf&src-supplier=Distrelec, ComponentLink5URL=https://www.distrelec.biz/Web/Downloads/he/et/B3U_eng_datasheet.pdf?mime=application%2Fpdf&src-supplier=Distrelec, ComponentLink6Description=http://www.onlinecomponents.com/productFiles/mf-OM/en-b3u.pdf?src-supplier=Onlinecomponents.com, ComponentLink6URL=http://www.onlinecomponents.com/productFiles/mf-OM/en-b3u.pdf?src-supplier=Onlinecomponents.com, ComponentLink7Description=https://www.verical.com/server-webapp/html/getDatasheet?partID=552554&src-supplier=Verical, ComponentLink7URL=https://www.verical.com/server-webapp/html/getDatasheet?partID=552554&src-supplier=Verical, ComponentLink8Description=http://www.farnell.com/datasheets/1685550.pdf?src-supplier=Element14, ComponentLink8URL=http://www.farnell.com/datasheets/1685550.pdf?src-supplier=Element14, ComponentLink9Description=http://www.farnell.com/datasheets/2610940.pdf?src-supplier=Farnell, ComponentLink9URL=http://www.farnell.com/datasheets/2610940.pdf?src-supplier=Farnell, ComponentLink10Description=https://www.alliedelec.com/m/d/4c8a9ef82804fc3c241a13c1e298fd73.pdf?src-supplier=Allied+Electronics, ComponentLink10URL=https://www.alliedelec.com/m/d/4c8a9ef82804fc3c241a13c1e298fd73.pdf?src-supplier=Allied+Electronics, Contact Material=Silver, Current Rating=50mA, Depth=2.5mm, Electrical Life=200000Cycles, Height=1.2mm, Illumination Type=Non-Illuminated,Illuminated, Item Type=Switch, Lead Free="Lead Free", Length=4mm, Manufacturer Part Number=B3U-1000P, Max Current Rating=50mA, Mechanical Life=200000Cycles, Mount="Surface Mount", Orientation=Straight, Packaging="Tape and Reel", Pricing 1="1=1, 10=0.961, 25=0.9064, 50=0.7976, 100=0.7251, 250=0.68888, 500=0.67074, 1000=0.52571 (USD)", REACH SVHC=Unknown, Stock 1=116454, Supplier 1=Digi-Key, Switch Function=Off-Mom, Switch Travel=0.15mm, Termination=SMD/SMT, Throw Configuration=SPST, Voltage Rating (DC)=12V, Weight=0.000776oz, Width=3mm
TP1 TP2 TP3 TP4 TP5 TP6 TP7 TP8: "Test Point ON", Item Type="TEST POINT"
U1: "500mA 70dB@(1kHz) Fixed 3.3V Positive electrode 7.5V XDFN-4-EP(1x1) Voltage Regulators - Linear, Low Drop Out (LDO) Regulators ROHS", LCSC Part Number=C379350, Manufacturer="RUNIC Technology", Item Type=IC, Manufacturer Part Number=RS3236-3.3YUTDN4, RoHS=No, Supplier=LCSC
U2: "133MHz LQFN-56(7x7) Microcontrollers (MCU/MPU/SOC) ROHS", LCSC Part Number=C2040, Manufacturer="Raspberry Pi", Package=LQFN-56(7x7), ComponentLink1Description=LCSC, ComponentLink1URL=https://www.lcsc.com/product-detail/Microcontrollers-MCU-MPU-SOC_Raspberry-Pi-RP2040_C2040.html, Item Type=IC, Manufacturer Part Number=RP2040
U3: "IC FLASH 16MBIT SPI/QUAD 8USON", LCSC Part Number=C2986331, Manufacturer=GigaDevice, Item Type=IC, Manufacturer Part Number=GD25Q16EEIGR, Pricing="1=0.84, 10=0.75, 25=0.7152, 50=0.69, 100=0.6658, 250=0.63504, 500=0.61266, 1000=0.59108 (USD)", RoHS=No, Stock=2468, Supplier=Digikey
X1: library part ABM8-272-T3, "CRYSTAL 12.0000MHZ 10PF SMD", LCSC Part Number=C20625731, Manufacturer=Abracon, Item Type=Crytal, Manufacturer Part Number=ABM8-272-T3, Pricing="1=0.58, 10=0.452, 50=0.452, 100=0.421, 1000=0.358, 10000=0.296 (USD)", RoHS=No, Stock=14884, Supplier=Mouser

## Via types
v1: diameter 0.45, hole 0.3, Top Layer to Bottom Layer, 55 vias

## Nets (pads, with @x,y where several pads share a name; then routed paths per layer and width w, separated by ;. In a path a pad name is that pad's centre, name@x,y a point inside that pad or via, vN(x,y) a via of type N, cw(c..) or ccw(c..) an arc to the next point about the centre after c; other vN are vias at no path point)
1V1: C6.1 C7.1 C8.1 TP3.1 U2.23 U2.45 U2.50 | length 17.3
  Top Layer w0.152: U2.23 16.15,13.325 16.185,13.36 C6.1@16.248,13.36
  Top Layer w0.203: C8.1 8,14.525 U2.45 v1(9.271,14.525) ; C7.1 U2.50 v1(9.271,12.525) ; v1@14.427,13.326 U2.23
  Bottom Layer w0.203: v1(9.271,12.525) 9.338,12.525 9.931,13.119 9.931,13.865 v1(9.271,14.525) 9.732,14.986 11.947,14.986 13.606,13.326 v1(14.426,13.326) TP3.1
3V3: C2.2 C3.1 C4.1 C5.1 C12.2 Q1.1 Q2.1 R4.2 R6.2 R8.1 R9.2 R12.1 TP2.1 U1.1 U2.1 U2.10 U2.22 U2.33 U2.42 U2.43 U2.44 U2.48 U2.49 U3.8 | length 84.3
  Top Layer w0.152: 8.175,13.068 8.175,12.959 8.209,12.925 U2.49 ; U2.48 U2.48@8.454,13.356 ; U2.1 U2.1@9.26,9.29 ; C3.1@9.26,8.083 C3.1 ; C4.1 C4.1@12.844,17.013 ; U2.33@12.844,16.155 U2.33 ; v1(12.849,8.578) U2.10 12.849,9.834 13.175,10.16 14.172,10.16 14.511,10.499 14.511,12.677 14.759,12.925 U2.22 ; R8.1@15.927,16.628 R8.1
  Top Layer w0.203: U3.8 5.727,11.896 5.328,12.295 5.328,12.824 5.661,13.157 8.55,13.157 ; U2.48 v1(9.271,13.325) ; C3.1@9.26,8.083 U2.1@9.26,9.29 ; C4.1 15.537,17.018 R8.1@15.927,16.628 ; U2.33@12.844,16.155 C4.1@12.844,17.013 ; v1(12.849,15.294) U2.33
  Top Layer w0.254: C2.2@7.282,2.24 C2.2@7.29,2.248 ; R9.2 16.192,6.846 16.194,6.844 16.713,6.844 17.101,6.457 17.101,4.188 v1@17.853,3.436 ; v1(17.856,3.439) 19.566,3.439 20.832,2.173 R4.2 ; v1(21.565,11.424) R12.1
  Top Layer w0.305: C2.2 7.633,2.248 7.709,2.324 7.709,3.049 8.114,3.454 9.73,3.454 10.288,4.011 10.288,6.322 9.292,7.318 C3.1
  Bottom Layer w0.254: v1(12.849,8.578) 14.823,8.578 15.57,9.325
  Bottom Layer w0.305: v1(8.115,3.439) 14.92,3.439 ; v1(9.271,13.325) 8.424,14.172 v1(8.424,16.119) 12.025,16.119 v1(12.849,15.294) 13.693,14.45 14.984,14.45 15.57,13.864 15.57,9.325 15.57,5.88 ; TP2.1 14.999,5.309 15.57,5.88 ; v1(21.565,11.424) 21.565,4.724 20.279,3.439 v1(17.856,3.439) 14.92,3.439 ; 14.92,3.439 15.57,4.089 15.57,5.88
5V: D1.2 D2.1 J1.1 J2.1 J3.1 R5.2 R10.2 TP1.1 | length 12.4
  Top Layer w0.254: R10.2 12.872,5.754 J2.1 v1(12.872,2.476) ; R5.2 25.104,1.04 25.394,1.33 v1(25.394,7.797)
  Top Layer w0.305: J3.1@22.954,11.378 24.054,11.378
  other v1: 24.663,11.378
GND: C1.1 C2.1 C3.2 C4.2 C5.2 C6.2 C7.2 C8.2 C9.1 C10.1 C11.1 C12.1 D2.2 D3.2 D4.2 D5.1 D6.1 J1.4 J1.SH1 J1.SH2 J2.3 J3.4 J4.3 SW1.2 SW2.2 TP6.1 U1.2 U1.5 U2.19 U2.57 U3.4 U3.9 X1.2 X1.4 | length 4.8
  Top Layer w0.152: U1.2 6.733,2.891 6.963,3.121 6.963,3.421 v1(6.981,3.439) ; C2.1 v1(8.357,1.308) ; C6.2 16.798,13.335 16.858,13.275 17.171,13.275 v1(17.228,13.218) ; v1(17.471,17.261) 17.474,17.259 17.474,16.656 C11.1
  Top Layer w0.203: v1(5.875,12.525) C7.2 ; C3.2 v1(8.692,8.578)
  Top Layer w0.254: v1(11.541,17.029) 11.553,17.018 C4.2
  other v1: 6.006,3.439 16.194,4.047 18.324,4.847 18.324,6.518 4.92,7.079 7.586,8.153 22.95,8.359 16.244,9.839 5.875,10.18 4.089,11.035 11.826,11.435 13.139,12.702 11.849,12.725 10.559,12.748 19.067,13.218 11.872,14.015 5.712,15.342 22.954,15.374 5.712,16.119
LED_1: Q1.2 R4.1 U2.15 | length 16.4
  Top Layer w0.254: U2.15 15.274,9.205 15.668,8.811 17.179,8.811 17.715,8.275 17.715,4.474 18.217,3.972 22.297,3.972 22.761,3.508 22.761,1.223 22.487,0.948 Q1.2
LED_2: Q2.2 R9.1 U2.14 | length 1.6
  Top Layer w0.254: U2.14 14.449,8.863 15.263,8.049 Q2.2
LED_BRD_SW: J3.3 R12.2 U2.29 | length 17
  Top Layer w0.152: U2.29 U2.29@14.453,16.154
  Top Layer w0.254: U2.29@14.453,16.154 v1(15.011,16.154) ; R12.2 21.565,13.078 21.847,13.36 24.263,13.36 24.663,13.76 v1(24.663,16.561)
  Bottom Layer w0.254: v1(15.011,16.154) 15.422,16.565 24.659,16.565 v1(24.663,16.561)
LIMIT_SW: D5.2 J4.1 R8.2 U2.28 | length 18.9
  Top Layer w0.254: U2.28 15.685,15.325 15.974,15.614 15.974,16.076 R8.2 ; v1(19.624,15.961) 20.273,15.311 20.273,5.543 D5.2 ; D5.2@20.969,4.872 21.244,5.147 J4.1@22.954,5.147 ; J4.1@22.95,5.151 J4.1@22.954,5.147 ; J4.1 J4.1@22.954,5.147
  Bottom Layer w0.254: v1(15.972,15.612) 16.321,15.961 v1(19.624,15.961)
LIMIT_SW_LED: D6.2 J4.2 U2.27 | length 16.7
  Top Layer w0.203: U2.27 16.488,14.925 v1(16.907,15.345)
  Top Layer w0.254: v1(20.817,15.345) 20.817,6.72 21.39,6.147 J4.2
  Bottom Layer w0.254: v1(16.907,15.345) v1(20.817,15.345)
NetC1_2: C1.2 D1.1 U1.3 U1.4
NetQ1_3: Q1.3 R5.1 R7.1
NetQ2_3: Q2.3 R10.1 R11.1
QSPI_CSN: R3.2 U2.56 U3.1 | length 7.4
  Top Layer w0.203: U3.1 5.727,6.811 6.033,6.504 7.803,6.504 8.142,6.843 8.142,9.506 8.424,9.789 U2.56
QSPI_SCK: U2.52 U3.6 | length 2.2
  Top Layer w0.152: U3.6 6.758,11.131 6.758,11.587 6.896,11.725 U2.52
QSPI_SIO_0: U2.53 U3.5 | length 1.4
  Top Layer w0.152: U3.5 7.227,11.252 7.301,11.325 U2.53
QSPI_SIO_1: U2.55 U3.2 | length 4.2
  Top Layer w0.152: U3.2 6.227,8.83 6.415,9.018 7.452,9.018 7.704,9.27 7.704,10.321 7.908,10.525 U2.55
QSPI_SIO_2: U2.54 U3.3 | length 7.8
  Top Layer w0.152: U2.54 9.166,10.925 9.353,10.738 9.353,10.308 v1(9.359,10.302)
  Top Layer w0.254: v1(6.727,7.139) U3.3
  Bottom Layer w0.254: v1(6.727,7.139) 8.591,7.139 9.359,7.907 v1(9.359,10.302)
QSPI_SIO_3: U2.51 U3.7 | length 3
  Top Layer w0.152: U3.7 6.227,11.777 6.576,12.125 U2.51
RGB_LED_1: J3.2 R7.2 | length 12.4
  Top Layer w0.254: J3.2@22.954,12.366 25.203,12.366 25.574,11.995 25.574,10.994 24.663,10.083 R7.2
RGB_LED_2: J2.2 R11.2 | length 5.5
  Top Layer w0.254: R11.2 13.864,7.927 14.172,7.619 14.172,4.096 J2.2
RP2040_BOOT: R3.1 SW1.1 | length 2.2
  Top Layer w0.254: R3.1 8.692,6.162 9.156,5.698 SW1.1
RUN: C11.2 R6.1 SW2.1 U2.26 | length 4
  Top Layer w0.254: U2.26 17.113,14.525 18.442,15.855 SW2.1
RX: TP8.1 U2.3 | length 4.6
  Top Layer w0.152: U2.3 10.058,9.291 10.058,8.826 10.224,8.661 10.7,8.661 10.84,8.52 v1(10.84,7.906)
  Bottom Layer w0.254: TP8.1 v1(10.84,7.906)
SWDCLK: TP5.1 U2.24 | length 13.3
  Top Layer w0.203: U2.24@15.28,13.725 18.667,13.725 v1(19.067,14.125)
  Bottom Layer w0.203: v1(19.067,14.125) 23.57,14.125 26.311,11.385 26.311,10.521 TP5.1
SWDIO: TP4.1 U2.25 | length 12.1
  Top Layer w0.203: U2.25 17.978,14.125 v1(18.617,14.764)
  Bottom Layer w0.203: v1(18.617,14.764) 24.716,14.764 TP4.1
TX: TP7.1 U2.2 | length 5.2
  Top Layer w0.152: U2.2 9.649,8.774 10.084,8.34 v1(10.084,7.899)
  Bottom Layer w0.254: TP7.1@7.923,5.637 TP7.1@8.32,5.637 ; TP7.1 10.084,6.909 v1(10.084,7.899)
USB_D+_N: D4.1 J1.2 R2.2 | length 14.4
  Top Layer w0.356: J1.2 2.988,7.89 3.429,8.331 D4.1 4.393,8.635 4.729,8.635 4.895,8.469 v1(4.92,8.469) ; 4.452,14.337 4.583,14.207 6.042,14.207 6.152,14.316 R2.2
  Bottom Layer w0.356: v1(4.224,14.384) 4.271,14.337 4.452,14.337 4.591,14.199 6.438,14.199 7.263,13.373 7.263,9.425 6.492,8.655 5.287,8.655 5.148,8.516
USB_D+_P: D3.1 J1.3 R1.2 | length 12.8
  Top Layer w0.356: J1.3 2.988,9.89 3.417,9.461 D3.1 4.393,9.157 4.729,9.157 4.895,9.323 v1(4.92,9.323) ; 4.452,13.577 4.599,13.724 6.039,13.724 6.164,13.598 R1.2
  Bottom Layer w0.356: v1(4.224,13.53) 4.271,13.577 4.452,13.577 4.591,13.716 6.238,13.716 6.781,13.173 6.781,9.625 6.292,9.137 5.287,9.137 5.148,9.276
USB_D_N: R2.1 U2.46 | length 1.8
  Top Layer w0.254: R2.1 6.737,14.266 6.745,14.258 6.795,14.258 6.928,14.125 U2.46
USB_D_P: R1.1 U2.47 | length 1.8
  Top Layer w0.254: R1.1 6.75,13.648 6.758,13.656 6.838,13.656 6.907,13.725 U2.47
XIN: C9.2 U2.20 X1.1 | length 5.5
  Top Layer w0.152: U2.20 16.035,12.125 16.244,11.916 C9.2 18.187,10.962 19.176,9.973 X1.1
XOUT: C10.2 U2.21 X1.3 | length 3.9
  Top Layer w0.152: U2.21 17.023,12.525 X1.3 17.476,12.173 17.969,12.665 17.969,13.28 C10.2
pads on no net: J1. J2.MP1 J2.MP2 J3.MP1 J3.MP2 J4.MP1 J4.MP2 U2.4 U2.5 U2.6 U2.7 U2.8 U2.9 U2.11 U2.12 U2.13 U2.16 U2.17 U2.18 U2.30 U2.31 U2.32 U2.34 U2.35 U2.36 U2.37 U2.38 U2.39 U2.40 U2.41

## Polygon pours and split planes (outlines as drawn)
GND on Top Layer "NONET_L01_P-001" (solid, pour order 0): -2.134,2.032 -2.134,15.748 cw(c-0.051,15.697) 0,17.78 25.834,17.78 cw(c25.834,15.748) 27.866,15.748 27.866,2.032 cw(c25.834,2.032) 25.834,0 0,0 cw(c-0.051,2.083)
GND on Bottom Layer "NONET_L01_P-001" (solid, pour order 1): -2.134,2.032 -2.134,15.748 cw(c-0.051,15.697) 0,17.78 25.834,17.78 cw(c25.834,15.748) 27.866,15.748 27.866,2.032 cw(c25.834,2.032) 25.834,0 0,0 cw(c-0.051,2.083)

## Other copper
Top Layer:
  rectangle net 5V: 12.472,2.186 13.272,4.847
  rectangle net 5V: 22.204,11.078 25.01,11.678
  rectangle net NetC1_2: 4.866,0.761 5.441,2.997
  rectangle net 3V3: 6.566,1.784 7.861,2.476
  region net LED_1: 22.221,1.758 20.697,1.758 20.697,1.409 22.221,1.409
  region net LED_1: 22.221,1.758 21.301,1.758 21.301,0.589 22.221,0.589
  region net 3V3: 22.221,2.388 20.697,2.388 20.697,2.038 22.221,2.038
  region net 3V3: 22.221,3.208 21.301,3.208 21.301,2.038 22.221,2.038
  region net NetQ1_3: 24.856,2.308 23.301,2.308 23.301,1.438 24.856,1.438
  rectangle net 3V3: 14.853,6.661 16.377,7.01
  rectangle net 3V3: 14.853,5.841 15.773,7.01
  rectangle net LED_2: 14.853,7.29 15.773,8.459
  rectangle net LED_2: 14.853,7.29 16.377,7.639
  rectangle net NetQ2_3: 12.218,6.639 13.773,7.509
  rectangle net 3V3: 4.721,10.75 5.725,11.45
  rectangle net 3V3: 7.033,15.825 9.359,16.475
  rectangle net 3V3: 15.773,16.493 16.932,16.84
  rectangle net RUN: 17.882,15.294 18.852,17.014
  rectangle net 3V3: 8.099,12.815 8.749,13.435
  rectangle net 3V3: 8.099,14.815 8.749,16.475
  rectangle net RUN: 16.561,15.876 18.852,16.228
  region net 3V3: 7.649,2.145 6.197,2.145 6.197,1.784 7.649,1.784
  rectangle net NetC1_2: 4.866,2.091 5.579,2.41
  rectangle net NetC1_2: 4.866,2.732 5.61,2.997
  rectangle net NetC1_2: 3.335,0.761 5.753,1.575
  rectangle net 5V: 1.778,4.597 4.47,6.248
  rectangle net 5V: 2.975,3.061 4.47,6.248
Bottom Layer:
  rectangle net 5V: 24.303,7.415 26.775,8.179
  rectangle net 5V: 3.378,1.93 24.562,2.845
  rectangle net 5V: 3.378,1.93 4.47,6.248
  rectangle net 5V: 1.778,4.597 4.47,6.248
  region net 5V: 25.07,1.93 25.07,11.685 24.282,11.685 24.282,1.93

## Silkscreen, mask and mechanical layers (free items; w line width, h text height)
Bottom Overlay:
  text "SWDIO" at 25.298,12.192 h1.52
  text "1V1" at 18.714,10.174 h1.52
  text "SWDCLK" at 25.298,9.601 h1.52
  text "5V" at 25.298,7.01 h1.52
  text "TX" at 7.061,4.521 h1.52
  text "3V3" at 17.628,4.445 h1.52
  text "GND" at 25.298,4.369 h1.52
  text "RX" at 12.344,2.261 h1.52
BoardCutout:
  lines w0.254: -2.134,15.953 -2.134,2.032 ccw(c-0.051,2.083) 0,0 25.834,0 ccw(c25.834,2.032) 27.866,2.032 27.866,15.968 ccw(c25.834,15.968) 25.834,18 0,18 ccw(c-0.051,15.917) -2.134,15.968

## Dimensions
25.834,18 to 25.834,0 on Mechanical 1
-2.134,15.953 to 27.866,15.968 on Mechanical 1

## Text inside footprints (layer, text, board x,y; h text height)
J1: Top Overlay "PCB EDGE" at -1.502,11.865 h0.8 r270